# Altium PCB ZloUSB.PcbDoc
Units mm, origin at the board's own origin, x right, y up, seen from the top; angles counter-clockwise.
Board outline 40 x 20 mm, 4 copper layers (L1, L2 (GND), L3 (PWR), L4), stack 1.586 mm thick; 42 components, 35 nets, 198 pads, 66 vias.
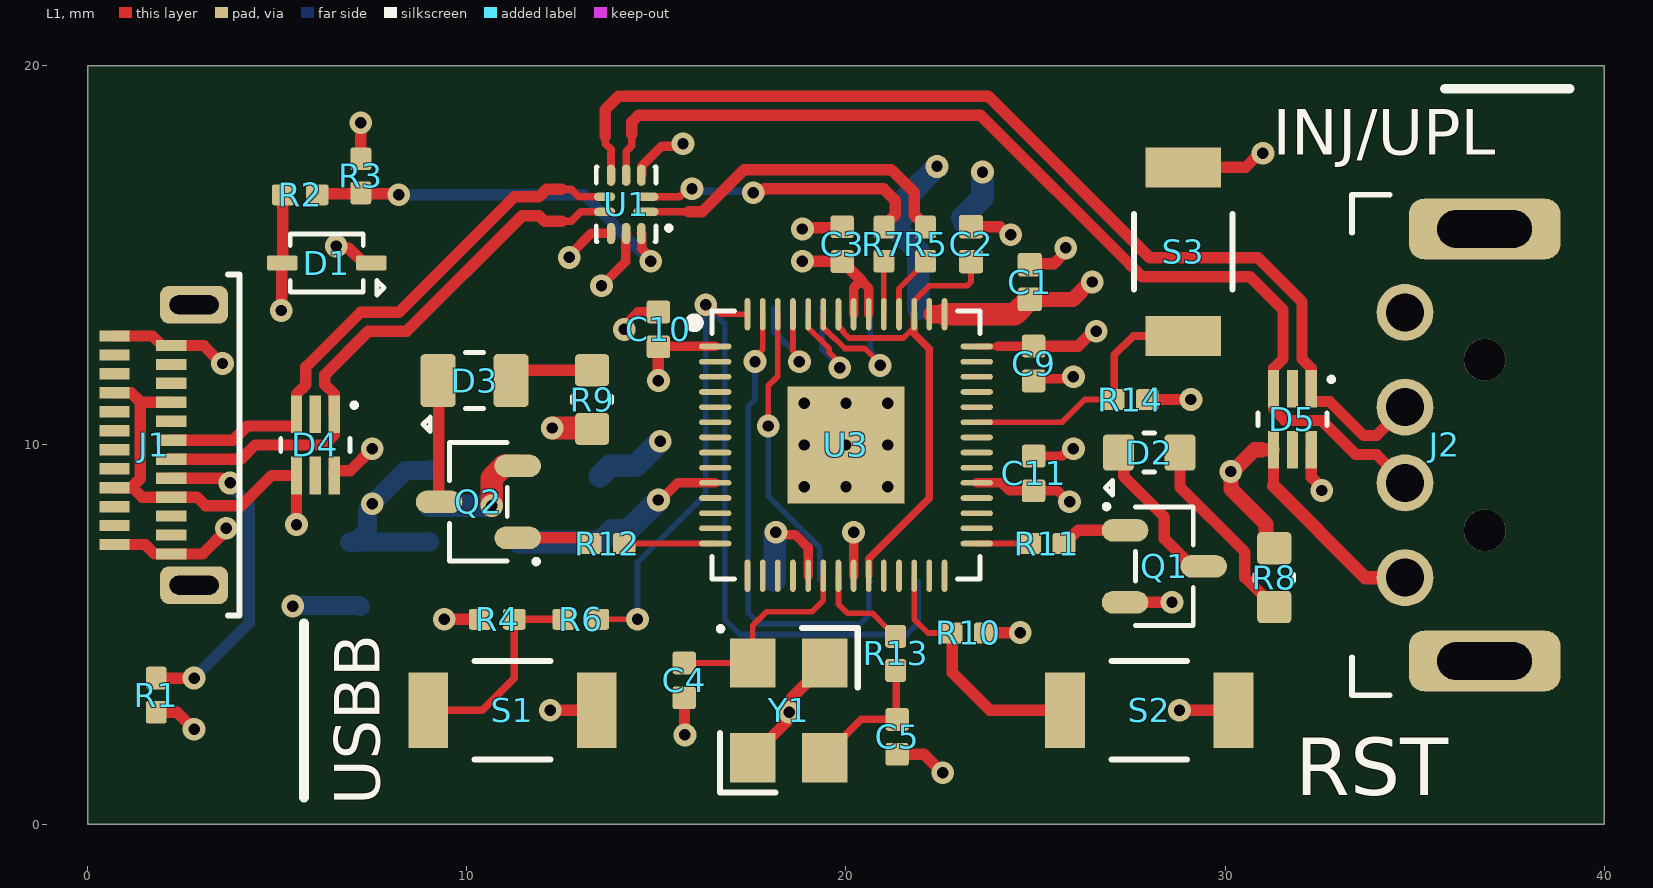
[diagram p0: L1 view]
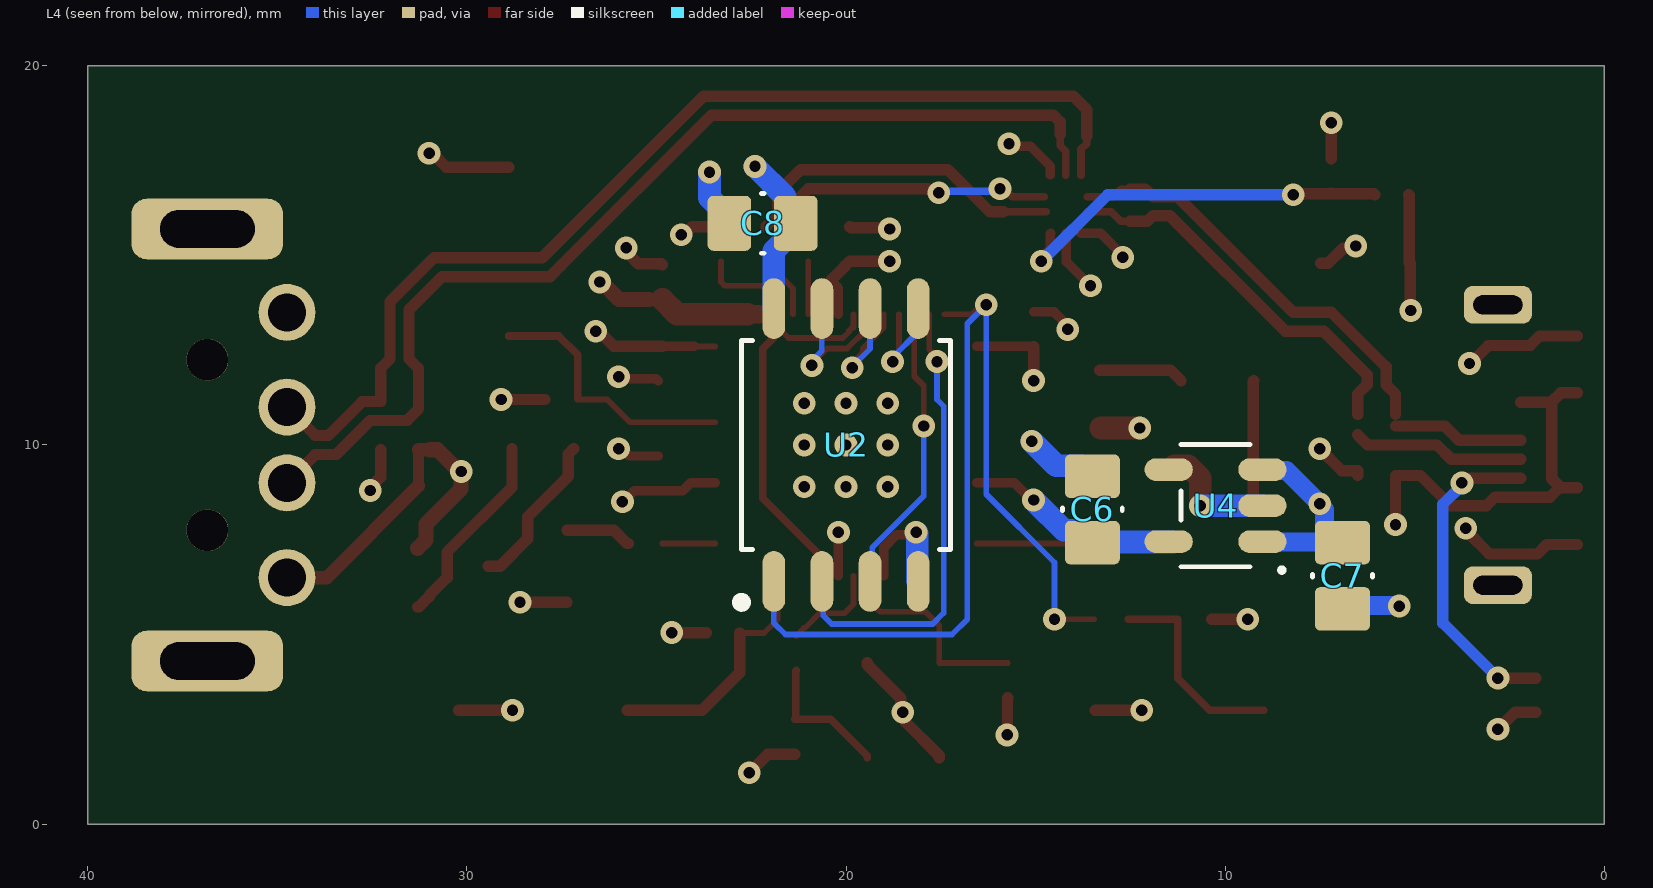
[diagram p1: L4 view, seen from below]
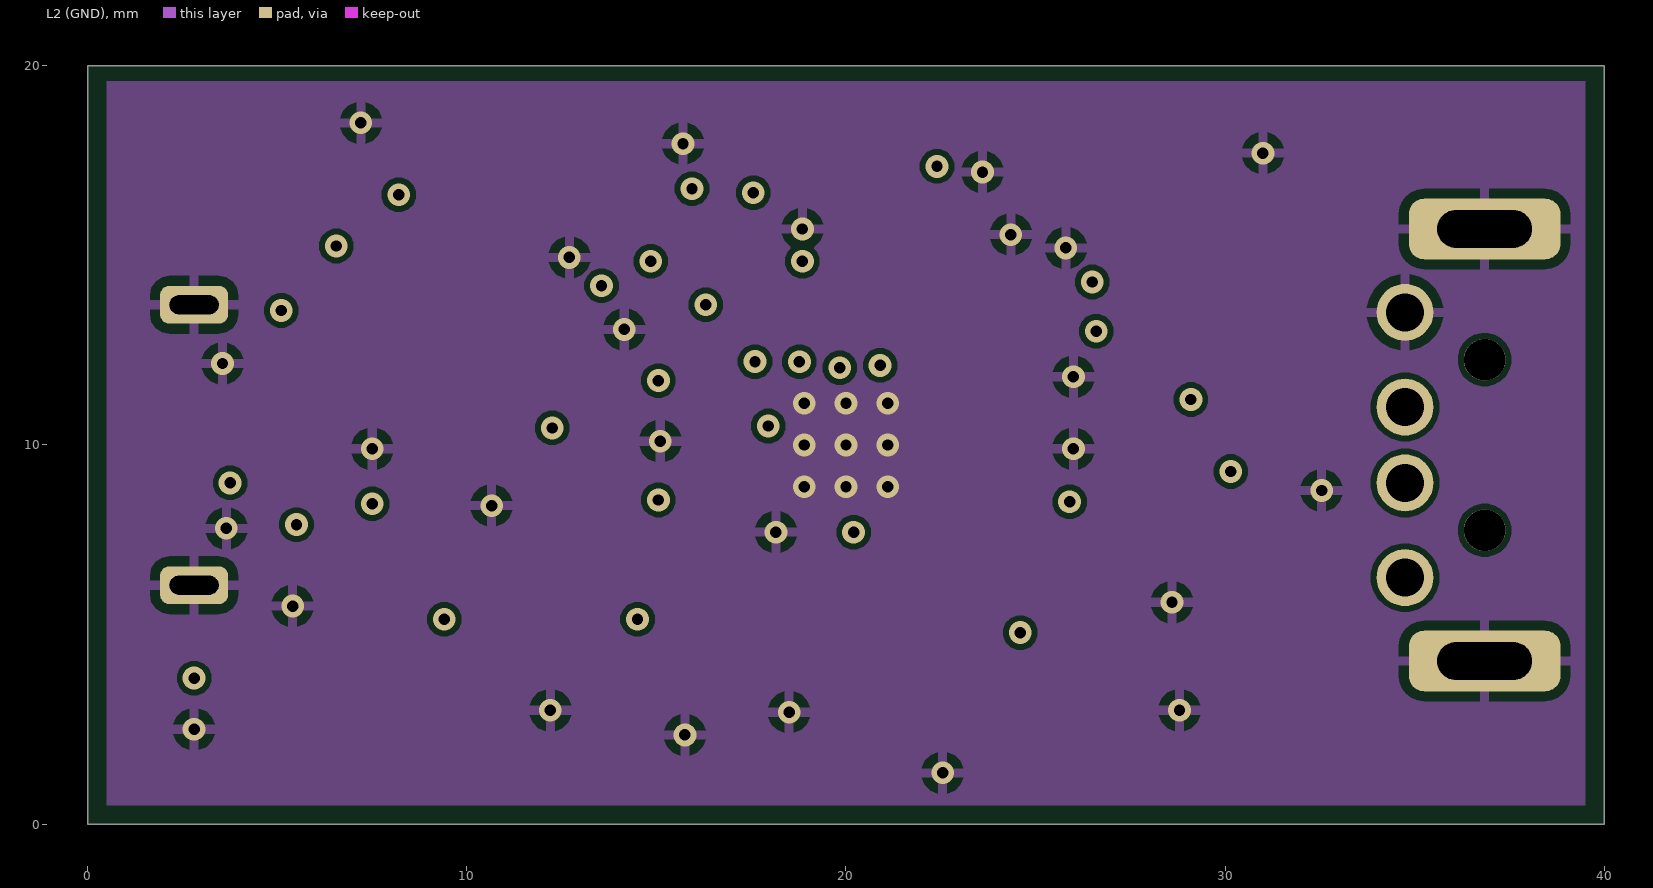
[diagram p2: L2 (GND)]
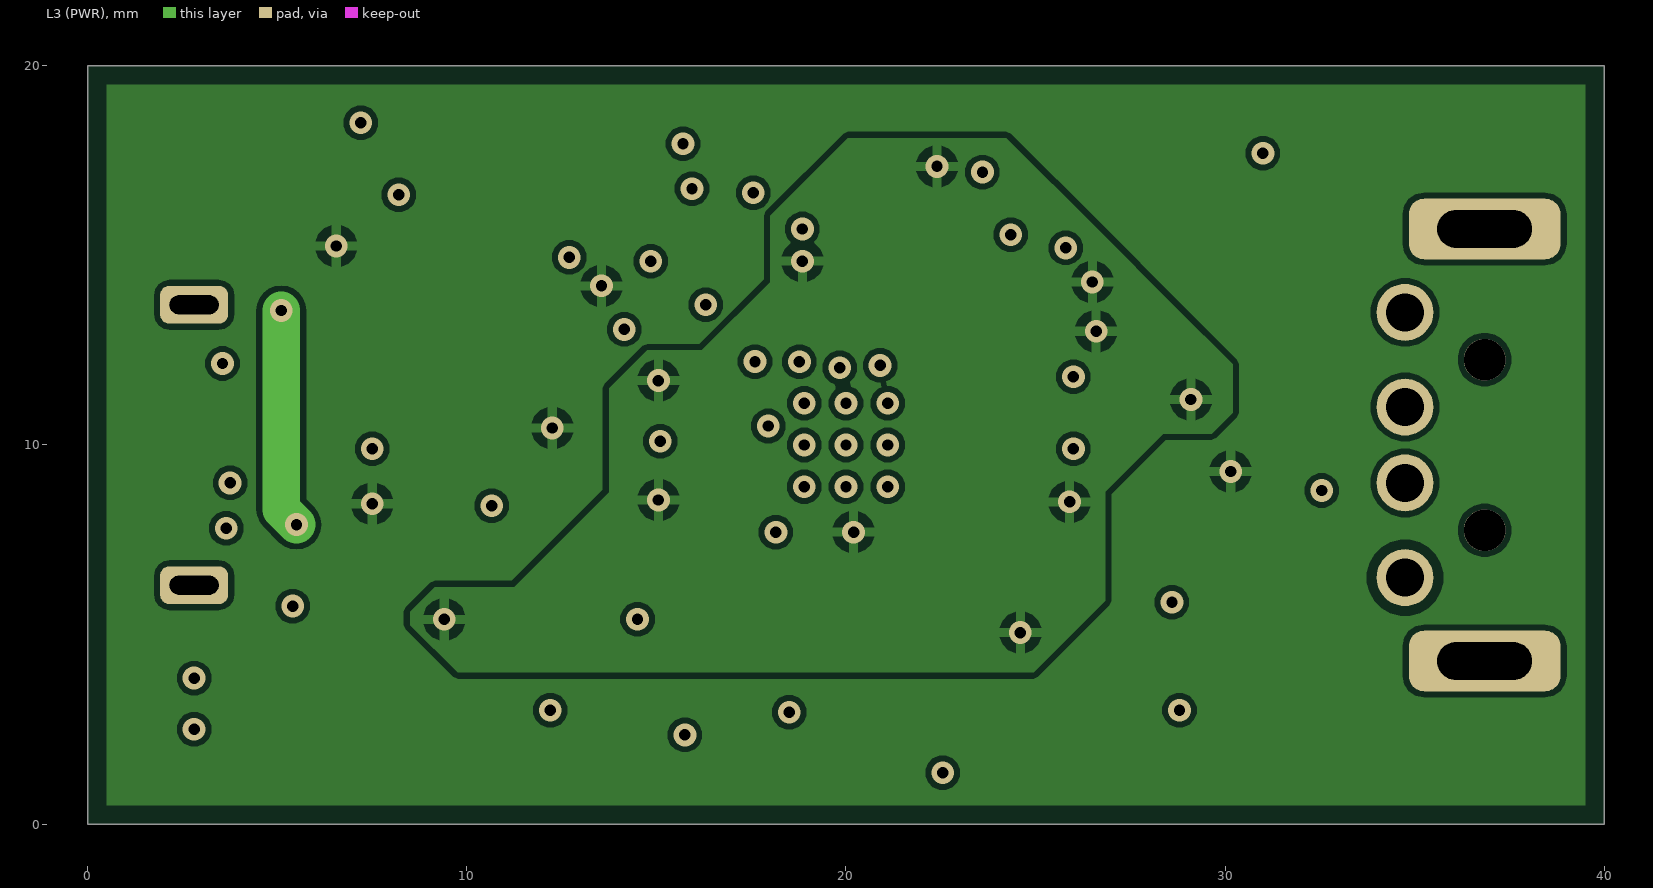
[diagram p3: L3 (PWR)]

## Layer stack, top to bottom
Top Solder: solder mask 0.0102, Solder Resist, Dk 3.5
L1: signal copper 0.035
Dielectric 1: prepreg 0.2104, PP-006, Dk 4.1
L2 (GND): signal copper 0.0152
Core: core 1.065, FR-4, Dk 4.8
L3 (PWR): signal copper 0.0152
Dielectric 4: prepreg 0.2104, PP-006, Dk 4.1
L4: signal copper 0.035
Bottom Solder: solder mask 0.0102, Solder Resist, Dk 3.5

## Board outline
0,0 40,0 40,20 0,20

## Design rules (kind name [scope] priority, off if disabled: settings)
BoardOutlineClearance [All] p1: gap=0.254 ignorepadtopadclearanceinfootprint=FALSE
Clearance [All] p1: gap=0.15 ignorepadtopadclearanceinfootprint=FALSE except(0.127: Arc-Arc Arc-Track Arc-SMDPad Track-Track Track-SMDPad; 0.25: Arc-Hole Track-Hole)
DiffPairsRouting [All] p1: maxlimit=0.4 minlimit=0.2 mostfreqgap=0.2 toplayer_minwidth=0.15 toplayer_maxwidth=0.381 toplayer_prefwidth=0.33 midlayer1_minwidth=0.15 midlayer1_maxwidth=0.381 midlayer1_prefwidth=0.33 midlayer2_minwidth=0.15 midlayer2_maxwidth=0.381 midlayer2_prefwidth=0.33 bottomlayer_minwidth=0.15 bottomlayer_maxwidth=0.381 bottomlayer_prefwidth=0.33 maxuncoupledlength=10
HoleSize [All] p1: absolutevalues=TRUE maxlimit=2.54 minlimit=0.2 maxpercent=80.000 minpercent=20.000
HoleToHoleClearance "Via Hole to Hole Clearance" [IsVia vs IsVia] p1: gap=0.254 allowstackedmicrovias=TRUE
HoleToHoleClearance "Pad Hole to Hole Clearance" [IsPad vs IsPad] p2: gap=0.475 allowstackedmicrovias=TRUE
MinimumSolderMaskSliver [All] p1: minsoldermaskwidth=0.12
PolygonConnect "+5V_VBUS Pad Disconnect" [InNet('+5V_VBUS') and IsPolygon vs Name = 'J2-1'] p1: connectstyle=NoConnect reliefconductorwidth=0.254 reliefentries=4 polygonreliefangle="90 Angle" airgapwidth=0.254
PolygonConnect [All] p2: connectstyle=Relief reliefconductorwidth=0.254 reliefentries=4 polygonreliefangle="90 Angle" airgapwidth=0.254
RoutingVias [All] p1: holewidth=0.3 width=0.6 viastyle="Through Hole" minholewidth=0.25 minwidth=0.35 maxholewidth=6.2 maxwidth=8.2
SilkToSolderMaskClearance [IsPad] p1: minsilkscreentomaskgap=0.18 clearancetoexposedcopper=TRUE
SolderMaskExpansion [All] p1: expansion=0 istentingtop=FALSE
SupplyNets "Schematic Supply Nets_3" [InNet('+5V_VBUS_C')] p1: voltage=0.000
SupplyNets "Schematic Supply Nets_2" [InNet('+5V_VBUS')] p2: voltage=0.000
SupplyNets "Schematic Supply Nets_1" [InNet('GND')] p3: voltage=0.000
SupplyNets "Schematic Supply Nets" [InNet('+3V3_REG')] p4: voltage=0.000
Width [All] p1: maxlimit=1 minlimit=0.127 preferedwidth=0.254
Width WidthPower [InNetClass('Power_Nets')] p2: maxlimit=1 minlimit=0.15 preferedwidth=0.3
25 further rules are at their usual default settings.

## Classes and differential pairs
net class USB_Nets: +3V3_REG +5V_VBUS +5V_VBUS_C GND NetJ1_A2 NetJ1_A3 NetJ1_A5 NetJ1_A8 NetJ1_A10 NetJ1_A11 NetJ1_B2 NetJ1_B3 NetJ1_B5 NetJ1_B6 NetJ1_B7 NetJ1_B8 NetJ1_B10 NetJ1_B11 NetR2_1 USB_A_D_N USB_A_D_P USB_C_D_N USB_C_D_P USB_D_N USB_D_P
net class Core_Nets: +3V3_REG +5V_VBUS GND GPIO11 GPIO18 "INJ/ U\P\L\" NetC2_1 NetC5_2 NetD2_1 NetD2_2 NetD3_1 NetD3_2 NetQ1_1 NetQ2_1 NetR5_2 NetR7_2 NetU3_2 NetU3_3 NetU3_4 NetU3_5 NetU3_6 NetU3_7 NetU3_8 NetU3_9 NetU3_11 NetU3_12 NetU3_13 NetU3_14 NetU3_15 NetU3_16 NetU3_17 NetU3_18 NetU3_24 NetU3_25 NetU3_27 NetU3_28 NetU3_30 NetU3_32 NetU3_34 NetU3_35 NetU3_36 NetU3_37 NetU3_38 NetU3_39 NetU3_40 NetU3_41 QSPI_SCLK QSPI_SD0 QSPI_SD1 QSPI_SD2 QSPI_SD3 QSPI_SS RUN U\S\B\_\B\O\O\T\ USB_D_N USB_D_P XIN XOUT
component class USB: C7 C8 D1 D4 D5 J1 J2 R1 R2 R3 U1 U4
component class Core: C1 C2 C3 C4 C5 C6 C9 C10 C11 D2 D3 Q1 Q2 R4 R5 R6 R7 R8 R9 R10 R11 R12 R13 R14 S1 S2 S3 U2 U3 Y1
differential pair USB_D: +USB_D_P -USB_D_N
differential pair USB_C_D: +USB_C_D_P -USB_C_D_N
differential pair USB_A_D: +USB_A_D_P -USB_A_D_N

## Components (designator, comment, footprint, x,y, rotation, side; value= is the part's Value field where it differs from the comment)
C1 "1uF/25V" CAPC1005X60N 24.85,14.3 r90 top
C2 "1uF/25V" CAPC1005X60N 23.3,15.3 r90 top locked
C3 "0.1uF/16V" CAPC1005X55N 19.9,15.3 r270 top locked
C4 "15pF/50V" CAPC1005X55N 15.73,3.79 r90 top locked
C5 "15pF/50V" CAPC1005X55N 21.35,2.3 r90 top
C6 "0.1uF/25V" CAPC2012X95N 13.5,8.3 r270 bottom
C7 "10uF/25V" CAPC2012X95N 6.9,6.55 r90 bottom
C8 "10uF/25V" CAPC2012X95N 22.2,15.85 r180 bottom
C9 "0.1uF/16V" CAPC1005X55N 24.95,12.15 r90 top
C10 "0.1uF/16V" CAPC1005X55N 15.05,13.05 r270 top
C11 "0.1uF/16V" CAPC1005X55N 24.95,9.25 r270 top
D1 "Guangdong Hottech 1N5819WS" SODFL250130X100N 6.3,14.8 r180 top locked
D2 "RED" DIOC1608X70N 28,9.8 r180 top
D3 "Green" DIOC2012X95N 10.2,11.7 r180 top locked
D4 "STMicroelectronics ESDAULC6-3BP6" "STMicroelectronics ESDAULC6-3BP6" 6,10 r270 top
D5 "STMicroelectronics ESDAULC6-3BP6" "STMicroelectronics ESDAULC6-3BP6" 31.78,10.68 r270 top
J1 "G-Switch GT-USB-9812A" "G-Switch GT-USB-9812A" 0.4,10 r270 top locked
J2 "YUWENFA PUBMA-R23A-016" "YUWENFA PUBMA-R23A-016" 36.85,10 r90 top
Q1 "JSCJ 2N7002" SOT95P240X115-3N 28.4,6.8 r0 top locked
Q2 "JSCJ 2N7002" SOT95P240X115-3N 10.3,8.5 r180 top locked
R1 "5k1" RESC1005X40N 1.8,3.4 r90 top
R2 "33K" RESC1005X40N 5.6,16.6 r180 top
R3 "47K" RESC1005X40N 7.2,17.1 r270 top
R4 "10K" RESC1005X40N 10.8,5.4 r180 top locked
R5 "27R4" RESC1005X40N 22.1,15.3 r270 top locked
R6 "1K" RESC1005X40N 13,5.4 r0 top locked
R7 "27R4" RESC1005X40N 21,15.3 r270 top locked
R8 "150R" RESC1608X55N 31.3,6.5 r90 top locked
R9 "100R" RESC1608X55N 13.3,11.2 r270 top locked
R10 "10K" RESC1005X40N 23.23,5.04 r0 top locked
R11 "1K" RESC1005X40N 25.3,7.4 r0 top locked
R12 "1K" RESC1005X40N 13.7,7.4 r180 top
R13 "1K" RESC1005X40N 21.31,4.5 r90 top locked
R14 "10K" RESC1005X40N 27.5,11.2 r0 top
S1 "XUNPU TS-1088-AR02016" "XUNPU TS-1088-AR02016" 11.2,3 r180 top locked
S2 "XUNPU TS-1088-AR02016" "XUNPU TS-1088-AR02016" 28,3 r180 top locked
S3 "XUNPU TS-1088-AR02016" "XUNPU TS-1088-AR02016" 28.9,15.1 r270 top
U1 "onsemi FSUSB42UMX" "onsemi FSUSB42UMX" 14.2,16.35 r180 top
U2 "W25Q128JVSIQ" SOIC127P790X216-8N 20,10 r90 bottom locked
U3 "RP2040" QFN40P700X700X90-57N 20,10 r0 top locked
U4 "AP2112K-3.3TRG1" SOT95P285X140-5N 10.25,8.4 r0 bottom
Y1 "ABM8-272-T3" "ABRACON ABM8-272-T3" 18.49,3 r270 top locked

## Footprints (in the part's own frame and the unit in brackets; to place one, negate y for a bottom-side part, rotate by r counter-clockwise, add the part's x,y. Pads: shape width x height; smd on the part's side, far side on the other; paste and mask are expansions set on the pad)
"ABRACON ABM8-272-T3" [mm]
  rect 1.3x1.2 smd mask+0.1: 1(-1.25,-0.95) 2(1.25,-0.95) 3(1.25,0.95) 4(-1.25,0.95)
  silkscreen extent -2.21,-1.86 2.17,1.82
CAPC1005X55N [mm] "Chip Capacitor, 2-Leads, Body 1.00x0.50mm, IPC Medium Density"
  rrect25% 0.6x0.62 smd mask+0.05: 1(-0.46,0) 2(0.46,0)
  body extent -0.5,-0.25 0.5,0.25, height 0.55
CAPC1005X60N [mm] "Chip Capacitor, 2-Leads, Body 1.00x0.50mm, IPC Medium Density"
  rrect25% 0.62x0.64 smd mask+0.05: 1(-0.46,0) 2(0.46,0)
  body extent -0.5,-0.25 0.5,0.25, height 0.6
CAPC2012X95N [mm] "Chip Capacitor, 2-Leads, Body 2.00x1.25mm, IPC Medium Density"
  rrect25% 1.15x1.45 smd mask+0.05: 1(-0.875,0) 2(0.875,0)
  silkscreen extent -0.04,-0.79 0.04,0.79, body extent -1,-0.63 1,0.63, height 0.95
DIOC1608X70N [mm] "Chip Diode, 2-Leads, Body 1.60x0.80mm, IPC Medium Density"
  rrect25% 0.825x0.95 smd mask+0.075: 1(-0.813,0) 2(0.813,0)
  silkscreen extent -0.14,-0.51 1.16,1.12, body extent -0.8,-0.4 0.8,0.4, height 0.7
DIOC2012X95N [mm] "Chip Diode, 2-Leads, Body 2.00x1.25mm, IPC Medium Density"
  rrect25% 0.925x1.4 smd mask+0.075: 1(-0.962,0) 2(0.962,0)
  silkscreen extent -0.24,-0.74 1.36,1.34, body extent -1,-0.63 1,0.63, height 0.95
"G-Switch GT-USB-9812A" [mm]
  rect 0.3x0.8 smd mask+0.04: A1(2.875,1.8) A2(2.375,1.8) A3(1.875,1.8) A4(1.375,1.8) A5(0.875,1.8) A6(0.375,1.8) A7(-0.125,1.8) A8(-0.625,1.8) A9(-1.125,1.8) A10(-1.625,1.8) A11(-2.125,1.8) A12(-2.625,1.8) B1(-2.875,0.3) B2(-2.375,0.3) B3(-1.875,0.3) B4(-1.375,0.3) B5(-0.875,0.3) B6(-0.375,0.3) B7(0.125,0.3) B8(0.625,0.3) B9(1.125,0.3) B10(1.625,0.3) B11(2.125,0.3) B12(2.625,0.3)
  rrect50% 1x1.8 hole 0.5 slot 1.3 at 90 deg mask+0.05: SH1(-3.7,2.4)
  rrect50% 1x1.8 hole 0.5 slot 1.3 at 90 deg mask+0.01: SH2(3.7,2.4)
  silkscreen extent -4.5,3.3 4.5,3.6
"onsemi FSUSB42UMX" [mm] "QFN, 10-Leads, Body 1.40x1.80mm, Pitch 0.40mm, IPC Medium Density"
  oval 0.663x0.225 smd mask+0.02: 1(-0.519,0.2)
  oval 0.563x0.225 smd mask+0.02: 2(-0.569,-0.2) 6(0.569,-0.2) 7(0.569,0.2)
  oval 0.225x0.563 smd mask+0.02: 3(-0.4,-0.769) 4(0,-0.769) 5(0.4,-0.769) 8(0.4,0.769) 9(0,0.769) 10(-0.4,0.769)
  silkscreen extent -1.19,-0.99 0.79,0.99, body extent -0.7,-0.9 0.7,0.9, height 0.55
QFN40P700X700X90-57N [mm] "QFN, 56-Leads, Body 7.00x7.00mm, Pitch 0.40mm, Thermal Pad 3.10x3.10mm, IPC Medium Density"
  oval 0.85x0.15 smd mask+0.05: 1(-3.45,2.6) 2(-3.45,2.2) 3(-3.45,1.8) 4(-3.45,1.4) 5(-3.45,1) 6(-3.45,0.6) 7(-3.45,0.2) 8(-3.45,-0.2) 9(-3.45,-0.6) 10(-3.45,-1) 11(-3.45,-1.4) 12(-3.45,-1.8) 13(-3.45,-2.2) 14(-3.45,-2.6) 29(3.45,-2.6) 30(3.45,-2.2) 31(3.45,-1.8) 32(3.45,-1.4) 33(3.45,-1) 34(3.45,-0.6) 35(3.45,-0.2) 36(3.45,0.2) 37(3.45,0.6) 38(3.45,1) 39(3.45,1.4) 40(3.45,1.8) 41(3.45,2.2) 42(3.45,2.6)
  oval 0.15x0.85 smd mask+0.05: 15(-2.6,-3.45) 16(-2.2,-3.45) 17(-1.8,-3.45) 18(-1.4,-3.45) 19(-1,-3.45) 20(-0.6,-3.45) 21(-0.2,-3.45) 22(0.2,-3.45) 23(0.6,-3.45) 24(1,-3.45) 25(1.4,-3.45) 26(1.8,-3.45) 27(2.2,-3.45) 28(2.6,-3.45) 43(2.6,3.45) 44(2.2,3.45) 45(1.8,3.45) 46(1.4,3.45) 47(1,3.45) 48(0.6,3.45) 49(0.2,3.45) 50(-0.2,3.45) 51(-0.6,3.45) 52(-1,3.45) 53(-1.4,3.45) 54(-1.8,3.45) 55(-2.2,3.45) 56(-2.6,3.45)
  rect 3.1x3.1 smd paste-1.55 mask+0.05: 57(0,0)
  silkscreen extent -4.13,-3.54 3.54,3.54, body extent -3.5,-3.5 3.5,3.5, height 0.9
RESC1005X40N [mm] "Chip Resistor, 2-Leads, Body 1.00x0.50mm, IPC Medium Density"
  rrect25% 0.6x0.55 smd mask+0.05: 1(-0.45,0) 2(0.45,0)
  body extent -0.5,-0.25 0.5,0.25, height 0.4
RESC1608X55N [mm] "Chip Resistor, 2-Leads, Body 1.60x0.80mm, IPC Medium Density"
  rrect25% 0.85x0.9 smd mask+0.05: 1(-0.775,0) 2(0.775,0)
  silkscreen extent -0.09,-0.51 0.09,0.51, body extent -0.8,-0.4 0.8,0.4, height 0.55
SODFL250130X100N [mm] "SODFL, 2-Leads, Body 1.70x1.30mm, IPC Medium Density"
  rrect25% 0.8x0.4 smd mask+0.075: 1(-1.175,0) 2(1.175,0)
  silkscreen extent -1.51,-0.76 0.96,0.84, body extent -0.85,-0.65 0.85,0.65, height 1
SOIC127P790X216-8N [mm] "SOIC, 8-Leads, Body 5.28x5.28mm, Pitch 1.27mm, IPC Medium Density"
  oval 1.6x0.6 smd mask+0.075: 1(-3.6,1.905) 2(-3.6,0.635) 3(-3.6,-0.635) 4(-3.6,-1.905) 5(3.6,-1.905) 6(3.6,-0.635) 7(3.6,0.635) 8(3.6,1.905)
  silkscreen extent -4.27,-2.75 2.75,2.88, body extent -2.64,-2.64 2.64,2.64, height 2.16
SOT95P240X115-3N [mm] "SOT23, 3-Leads, Body 2.90x2.40mm, Pitch 0.95mm, IPC Medium Density"
  oval 1.225x0.6 smd mask+0.075: 1(-1.038,0.95) 2(-1.038,-0.95) 3(1.037,0)
  silkscreen extent -1.59,-1.56 0.76,1.64, body extent -0.65,-1.45 0.65,1.45, height 1.15
SOT95P285X140-5N [mm] "SOT23, 5-Leads, Body 3.00x2.85mm, Pitch 0.95mm, IPC Medium Density"
  oval 1.275x0.6 smd mask+0.075: 1(-1.238,0.95) 2(-1.238,0) 3(-1.238,-0.95) 4(1.237,-0.95) 5(1.237,0.95)
  silkscreen extent -1.81,-1.61 0.91,1.76, body extent -0.8,-1.5 0.8,1.5, height 1.4
"STMicroelectronics ESDAULC6-3BP6" [mm] "SOTFL, 6-Leads, Body 1.60x1.60mm, Pitch 0.50mm, IPC Medium Density"
  rect 0.99x0.3 smd mask+0.04: 1(-0.805,0.5) 2(-0.805,0) 3(-0.805,-0.5) 4(0.805,-0.5) 5(0.805,0) 6(0.805,0.5)
  silkscreen extent -1.11,-0.91 0.17,1.09
"XUNPU TS-1088-AR02016" [mm]
  rect 1.05x2 smd mask+0.075: 1(-2.225,0) 2(2.225,0)
  silkscreen extent -1,-1.3 1,1.3
"YUWENFA PUBMA-R23A-016" [mm]
  round 1.5 hole 1 mask+0.075: 1(-3.5,2.1) 2(-1,2.1) 3(1,2.1) 4(3.5,2.1)
  rrect50% 1.6x4 hole 1 slot 2.5 at 90 deg mask+0.075: S1(-5.7,0) S2(5.7,0)
  round 1.1 hole 1.1 unplated mask+0.1: ""(-2.25,0) ""(2.25,0)
  silkscreen extent -6.6,2.5 6.6,3.5

## Part data
C1 C2: library part "Samsung Electro-Mechanics CL05A105KA5NQNC", "CAP CER 1UF 25V X5R 0402", JLCPCB Parts Type=Basic, JLCPCB PCBA Type="Economic and Standard", LCSC Part #=C52923, Manufacturer="Samsung Electro-Mechanics", Manufacturer Part Number=CL05A105KA5NQNC, ComponentLink1Description=Datasheet, ComponentLink1URL=https://mm.digikey.com/Volume0/opasdata/d220001/medias/docus/41/CL05A105KA5NQNC.pdf, Supplier 1=LCSC, Supplier Part Number 1=C52923
C3 C9 C10 C11: library part "Samsung Electro-Mechanics CL05B104KO5NNNC", "CAP CER 0.1UF 16V X7R 0402", JLCPCB Parts Type=Basic, JLCPCB PCBA Type="Economic and Standard", LCSC Part #=C1525, Manufacturer="Samsung Electro-Mechanics", Manufacturer Part Number=CL05B104KO5NNNC, ComponentLink1Description=Datasheet, ComponentLink1URL=https://mm.digikey.com/Volume0/opasdata/d220001/medias/docus/609/CL05B104KO5NNNC.pdf
C4 C5: library part "FH 0402CG150J500NT", "CAP CER 15pF 50V C0G 0402", JLCPCB Parts Type=Basic, JLCPCB PCBA Type="Economic and Standard", LCSC Part #=C1548, Manufacturer=FH, Manufacturer Part Number=0402CG150J500NT, ComponentLink1Description=Datasheet, ComponentLink1URL=https://www.lcsc.com/datasheet/C1548.pdf?spm=wm.sxq.inf.ggs&lcsc_vid=FlIPVFxSEVAMBl1QQ1JdVl0EQlZYVFFSQVZZUFJeRVcxVlNeQ1ZcX1ZUQlReXjsOAxUeFF5JWBYZEEoKFBINSQcJGk4%3D
C6: library part "Yageo CC0805KRX7R8BB104", "CAP CER 0.1UF 25V X7R 0805", JLCPCB Parts Type=Extended, JLCPCB PCBA Type="Economic and Standard", LCSC Part #=C519981, Manufacturer=Yageo, Manufacturer Part Number=CC0805KRX7R8BB104, ComponentLink1Description=Datasheet, ComponentLink1URL=https://yageogroup.com/content/datasheet/asset/file/UPY-GPHC_X7R_6_3V-TO-250V, Supplier 1=LCSC, Supplier Part Number 1=C519981
C7 C8: library part "Samsung Electro-Mechanics CL21B106KAYQNNE", "CAP CER 10uF 25V X7R 0805", JLCPCB Parts Type=Extended, JLCPCB PCBA Type="Economic and Standard", LCSC Part #=C3039694, Manufacturer="Samsung Electro-Mechanics", Manufacturer Part Number=CL21B106KAYQNNE, ComponentLink1Description=Datasheet, ComponentLink1URL=https://mm.digikey.com/Volume0/opasdata/d220001/medias/docus/7851/1276_CL21B1.pdf, Supplier 1=LCSC, Supplier Part Number 1=C3039694
D1: "DIODE SCHOTTKY 40V SOD-323", JLCPCB Parts Type=Basic, JLCPCB PCBA Type="Economic and Standard", LCSC Part #=C191023, Manufacturer="Guangdong Hottech", Manufacturer Part Number=1N5819WS, ComponentLink1Description=Datasheet, ComponentLink1URL=https://www.lcsc.com/datasheet/C191023.pdf?spm=wm.sxq.inf.ggs&lcsc_vid=FgUKAwAHT1hdAgBSEQJZUFZfRwdWX1BXQgcMVwVSEgcxVlNeQ1dbV11VRlhXXzsOAxUeFF5JWBYZEEoKFBINSQcJGk4%3D, ComponentLink2Description="3D Model Source", Supplier 1=LCSC, Supplier Part Number 1=C191023
D2: library part "Hubei KENTO Elec KT-0603R", "LED RED WATER CLEAR 0603 SMD", JLCPCB Parts Type=Basic, JLCPCB PCBA Type="Economic and Standard", LCSC Part #=C2286, Manufacturer="Hubei KENTO Elec", Manufacturer Part Number=KT-0603R, ComponentLink1Description=Datasheet, ComponentLink1URL=https://www.lcsc.com/datasheet/C2286.pdf?spm=wm.sxq.inf.ggs&lcsc_vid=EgULX1wEEgNWVVAHFFheXgEEQVBbUFYFRwIPBF1XRgMxVlNeQ1RbXlJRQFJaUzsOAxUeFF5JWBYZEEoKFBINSQcJGk4%3D, ComponentLink2Description="3D Model Source"
D3: library part "Hubei KENTO Elec KT-0805G", "LED EMERALD GREEN 0805 SMD", JLCPCB Parts Type=Basic, JLCPCB PCBA Type="Economic and Standard", LCSC Part #=C2297, Manufacturer="Hubei KENTO Elec", Manufacturer Part Number=KT-0805Y, ComponentLink1Description=Datasheet, ComponentLink1URL=https://www.lcsc.com/datasheet/C2297.pdf?spm=wm.sxq.inf.ggs&lcsc_vid=EgULX1wEEgNWVVAHFFheXgEEQVBbUFYFRwIPBF1XRgMxVlNeQ1RYVlRQT1VeUDsOAxUeFF5JWBYZEEoKFBINSQcJGk4%3D, ComponentLink2Description="3D Model Source"
D4 D5: "TVS DIODE 5VWM SOT666", JLCPCB Parts Type=Extended, JLCPCB PCBA Type="Economic and Standard", LCSC Part #=C1976755, Manufacturer=STMicroelectronics, Manufacturer Part Number=ESDAULC6-3BP6, ComponentLink1Description=Datasheet, ComponentLink1URL=https://www.st.com/resource/en/datasheet/cd00165276.pdf, ComponentLink2Description="3D Model Source"
J1: "USB 3.1 SMD USB, DVI, HDMI Connector Adapters RoHS", JLCPCB Parts Type=Extended, JLCPCB PCBA Type="Economic and Standard", LCSC Part #=C53055684, Manufacturer=G-Switch, Manufacturer Part Number=GT-USB-9812A, ComponentLink1Description=Datasheet, ComponentLink1URL=https://www.lcsc.com/datasheet/C53055684.pdf?spm=wm.sxq.inf.ggs&lcsc_vid=QFhdBFUAE1JXUFRfFQQLUV0CQlRcUV0CRAJZXwEFRlYxVlNeQ1leUVJRT1lcVTsOAxUeFF5JWBYZEEoKFBINSQcJGk4%3D, ComponentLink2Description="3D Model Source"
J2: "-25℃~+85℃ 0.95mm 1 1,500 Cycles 1.5A 18.8mm 30V 4P Male Recessed Type-A USB 2.0 White With Locating Pins Plugin USB Connectors ROHS", JLCPCB Parts Type=Extended, JLCPCB PCBA Type="Economic and Standard", LCSC Part #=C55061488, Manufacturer=YUWENFA, Manufacturer Part Number=PUBMA-R23A-016, ComponentLink1Description=Datasheet, ComponentLink1URL=https://www.lcsc.com/datasheet/C55061488.pdf, ComponentLink2Description="3D Model Source"
Q1 Q2: "MOSFET N-CH 60V 115mA SOT-23", JLCPCB Parts Type=Basic, JLCPCB PCBA Type="Economic and Standard", LCSC Part #=C8545, Manufacturer=JSCJ, Manufacturer Part Number=2N7002, ComponentLink1Description=Datasheet, ComponentLink1URL=https://www.lcsc.com/datasheet/C8545.pdf?spm=wm.sxq.inf.ggs&lcsc_vid=EgULX1wEEgNWVVAHFFheXgEEQVBbUFYFRwIPBF1XRgMxVlNeQ1RYUlNfQFBWVTsOAxUeFF5JWBYZEEoKFBINSQcJGk4%3D, ComponentLink3Description="3D Model Source"
R1: library part "UNI-ROYAL 0402WGF5101TCE", "RES 5.1kΩ ±1% 62.5mW 0402", JLCPCB Parts Type=Basic, JLCPCB PCBA Type="Economic and Standard", LCSC Part #=C25905, Manufacturer=UNI-ROYAL, Manufacturer Part Number=0402WGF5101TCE, ComponentLink1Description=Datasheet, ComponentLink1URL=https://www.lcsc.com/datasheet/C25905.pdf?spm=wm.sxq.inf.ggs&lcsc_vid=QwRWVlFeFgUPVwAHRlQMVFRWElEIXlYDQFlcUQdRRFYxVlNeRVdaVFZVRFRdXzsOAxUeFF5JWBYZEEoKFBINSQcJGk4%3D, ComponentLink2Description="3D Model Source"
R2: library part "UNI-ROYAL 0402WGF3302TCE", "RES 33kΩ ±1% 62.5mW 0402", JLCPCB Parts Type=Basic, JLCPCB PCBA Type="Economic and Standard", LCSC Part #=C25779, Manufacturer=UNI-ROYAL, Manufacturer Part Number=0402WGF3302TCE, ComponentLink1Description=Datasheet, ComponentLink1URL=https://www.lcsc.com/datasheet/C25779.pdf?spm=wm.sxq.inf.ggs&lcsc_vid=FgUKAwAHT1hdAgBSEQJZUFZfRwdWX1BXQgcMVwVSEgcxVlNeQ1dbVVBSRVJXVzsOAxUeFF5JWBYZEEoKFBINSQcJGk4%3D, ComponentLink2Description="3D Model Source"
R3: library part "UNI-ROYAL 0402WGF4702TCE", "RES 47kΩ ±1% 62.5mW 0402", JLCPCB Parts Type=Basic, JLCPCB PCBA Type="Economic and Standard", LCSC Part #=C25792, Manufacturer=UNI-ROYAL, Manufacturer Part Number=0402WGF4702TCE, ComponentLink1Description=Datasheet, ComponentLink1URL=https://www.lcsc.com/datasheet/C25792.pdf?spm=wm.sxq.inf.ggs&lcsc_vid=FgUKAwAHT1hdAgBSEQJZUFZfRwdWX1BXQgcMVwVSEgcxVlNeQ1dbVVFURVhdVTsOAxUeFF5JWBYZEEoKFBINSQcJGk4eFQsCAgIaSgADAwAHC0slRVRZUF1IHxUDCw%3D%3D, ComponentLink2Description="3D Model Source"
R4 R10 R14: library part "UNI-ROYAL 0402WGF1002TCE", "RES 10kΩ ±1% 62.5mW 0402", JLCPCB Parts Type=Basic, JLCPCB PCBA Type="Economic and Standard", LCSC Part #=C25744, Manufacturer=UNI-ROYAL, Manufacturer Part Number=0402WGF1002TCE, ComponentLink1Description=Datasheet, ComponentLink1URL=https://www.lcsc.com/datasheet/C25905.pdf?spm=wm.sxq.inf.ggs&lcsc_vid=QwRWVlFeFgUPVwAHRlQMVFRWElEIXlYDQFlcUQdRRFYxVlNeRVdaVFZVRFRdXzsOAxUeFF5JWBYZEEoKFBINSQcJGk4%3D, ComponentLink2Description="3D Model Source"
R5 R7: library part "UNI-ROYAL 0402WGF274JTCE", "RES 27.4Ω ±1% 62.5mW 0402", JLCPCB Parts Type=Extended, JLCPCB PCBA Type="Economic and Standard", LCSC Part #=C31439, Manufacturer=UNI-ROYAL, Manufacturer Part Number=0402WGF274JTCE, ComponentLink1Description=Datasheet, ComponentLink1URL=https://www.lcsc.com/datasheet/C31439.pdf?spm=wm.sxq.inf.ggs&lcsc_vid=RVMLXldXRwcKUgUEEVhaBQcAQ1deVlcCFVAKV1VTRVcxVlNeRVdaX1xXQ1laUDsOAxUeFF5JWBYZEEoKFBINSQcJGk4%3D, ComponentLink2Description="3D Model Source", Supplier 1=LCSC, Supplier Part Number 1=C31439
R6 R11 R12 R13: library part "UNI-ROYAL 0402WGF1001TCE", "RES 1kΩ ±1% 62.5mW 0402", JLCPCB Parts Type=Basic, JLCPCB PCBA Type="Economic and Standard", LCSC Part #=C11702, Manufacturer=UNI-ROYAL, Manufacturer Part Number=0402WGF1001TCE, ComponentLink1Description=Datasheet, ComponentLink1URL=https://www.lcsc.com/datasheet/C25905.pdf?spm=wm.sxq.inf.ggs&lcsc_vid=QwRWVlFeFgUPVwAHRlQMVFRWElEIXlYDQFlcUQdRRFYxVlNeRVdaVFZVRFRdXzsOAxUeFF5JWBYZEEoKFBINSQcJGk4%3D, ComponentLink2Description="3D Model Source"
R8: library part "UNI-ROYAL 0603WAF1500T5E", "RES 150Ω ±1% 100mW 0603", JLCPCB Parts Type=Basic, JLCPCB PCBA Type="Economic and Standard", LCSC Part #=C22808, Manufacturer=UNI-ROYAL, Manufacturer Part Number=0603WAF1500T5E, ComponentLink1Description=Datasheet, ComponentLink1URL=https://www.lcsc.com/datasheet/C22808.pdf?spm=wm.sxq.inf.ggs&lcsc_vid=EgULX1wEEgNWVVAHFFheXgEEQVBbUFYFRwIPBF1XRgMxVlNeQ1RYUVJQQFdbXzsOAxUeFF5JWBYZEEoKFBINSQcJGk4%3D, ComponentLink2Description="3D Model Source"
R9: library part "UNI-ROYAL 0603WAF1000T5E", "RES 100Ω ±1% 100mW 0603", JLCPCB Parts Type=Basic, JLCPCB PCBA Type="Economic and Standard", LCSC Part #=C22775, Manufacturer=0603WAF1000T5E, ComponentLink1Description=Datasheet, ComponentLink1URL=https://www.lcsc.com/datasheet/C22775.pdf?spm=wm.sxq.inf.ggs&lcsc_vid=EgULX1wEEgNWVVAHFFheXgEEQVBbUFYFRwIPBF1XRgMxVlNeQ1RYUFVUR1VcXjsOAxUeFF5JWBYZEEoKFBINSQcJGk4eFQsCAgIaSgADAwAHC0slRVNWV1xIHxUDCw%3D%3D, ComponentLink2Description="3D Model Source", Manufacturer Part Number=0603WAF1000T5E
S1 S2 S3: "SWITCH TACTILE SPST 160gf SMD", JLCPCB Parts Type=Basic, JLCPCB PCBA Type="Economic and Standard", LCSC Part #=C720477, Manufacturer=XUNPU, Manufacturer Part Number=TS-1088-AR02016, ComponentLink1Description=Datasheet, ComponentLink1URL=https://www.lcsc.com/datasheet/C720477.pdf?spm=wm.sxq.inf.ggs&lcsc_vid=QlFWU1RUTlJcVlxXFVVfUV1WQlNXBFRVFQQIX1EFTwMxVlNeRVldVFxXRVlXUTsOAxUeFF5JWBYZEEoKFBINSQcJGk4%3D, ComponentLink2Description="3D Model Source", Supplier 1=LCSC, Supplier Part Number 1=C720477
U1: "IC USB SWITCH DPDT 10UMLP", JLCPCB Parts Type=Extended, JLCPCB PCBA Type="Economic and Standard", LCSC Part #=C11145, Manufacturer=onsemi, Manufacturer Part Number=FSUSB42UMX, ComponentLink1Description=Datasheet, ComponentLink1URL=https://www.onsemi.com/pdf/datasheet/fsusb42-d.pdf, ComponentLink2Description="3D Model Source", Supplier 1=LCSC, Supplier Part Number 1=C11145
U2: library part "Winbond W25Q128JVSIQ", "FLASH - NOR Memory IC 128Mbit SPI - Quad I/O, QPI 133 MHz 8-SOIC", JLCPCB Parts Type=Basic, JLCPCB PCBA Type="Economic and Standard", LCSC Part #=C97521, Manufacturer="Winbond Electronics", ComponentLink1Description=Datasheet, ComponentLink1URL=https://mm.digikey.com/Volume0/opasdata/d220001/medias/docus/7161/256_W25Q128JV.pdf, ComponentLink2Description="3D Model Source", Manufacturer Part Number=W25Q128JVSIQ, Supplier 1=LCSC, Supplier Part Number 1=C97521
U3: library part "Raspberry Pi RP2040", "ARM® Cortex®-M0+ - Microcontroller IC 32-Bit Dual-Core 133MHz External Program Memory 56-QFN (7x7)", JLCPCB Parts Type=Extended, JLCPCB PCBA Type="Economic and Standard", LCSC Part #=C2040, Manufacturer="Raspberry Pi", Manufacturer Part Number=SC0914(13), ComponentLink1Description=Datasheet, ComponentLink1URL=https://pip-assets.raspberrypi.com/categories/814-rp2040/documents/RP-008371-DS-1-rp2040-datasheet.pdf, ComponentLink2Description="3D Model Source", Supplier 1=LCSC, Supplier Part Number 1=C2040
U4: library part "Diodes Inc. AP2112K-3.3TRG1", "IC REG LINEAR 3.3V 600MA SOT-25", JLCPCB Parts Type=Extended, JLCPCB PCBA Type="Economic and Standard", LCSC Part #=C51118, Manufacturer="Diodes Incorporated", ComponentLink1Description=Datasheet, ComponentLink1URL=https://www.diodes.com/assets/Datasheets/AP2112.pdf, Manufacturer Part Number=AP2112K-3.3TRG1, Supplier 1=LCSC, Supplier Part Number 1=C51118
Y1: library part "ABRACON ABM8-272-T3", "12 MHz ±30ppm Crystal 10pF 50 Ohms 4-SMD, No Lead", JLCPCB Parts Type=Extended, JLCPCB PCBA Type="Economic and Standard", LCSC Part #=C20625731, Manufacturer=ABRACON, ComponentLink1Description=Datasheet, ComponentLink1URL=https://abracon.com/datasheets/ABM8-272-T3.pdf, ComponentLink2Description="3D Model Source", Manufacturer Part Number=ABM8-272-T3, Supplier 1=LCSC, Supplier Part Number 1=C20625731

## Via types
v1: diameter 0.6, hole 0.3, L1 to L4, tented both sides, 52 vias
v2: diameter 0.6, hole 0.3, L1 to L4, tented bottom, 9 vias
v3: diameter 0.6, hole 0.3, L1 to L4, 5 vias

## Nets (pads, with @x,y where several pads share a name; then routed paths per layer and width w, separated by ;. In a path a pad name is that pad's centre, name@x,y a point inside that pad or via, vN(x,y) a via of type N, cw(c..) or ccw(c..) an arc to the next point about the centre after c; other vN are vias at no path point)
+3V3_REG: C1.1 C3.2 C6.2 C8.2 C9.2 C10.2 C11.2 R4.2 R10.2 R14.2 U2.8 U3.1 U3.10 U3.22 U3.33 U3.42 U3.43 U3.44 U3.48 U3.49 U4.5 | length 30.5
  L1 w0.15: U3.42 23.99,12.6 24,12.61
  L1 w0.25: v1(15.05,8.55) 15.105,8.55 15.555,9 U3.10 ; C10.2@15.06,12.6 U3.1 ; U3.22 v1(20.2,7.7) ; U3.49 20.2,14.14 20.4,14.34 20.6,14.14 U3.48 ; U3.33 24.1,9 24.31,8.79 C11.2 25.592,8.79 25.882,8.5 v1(25.9,8.5) ; 24,12.61 C9.2@24.85,12.61
  L1 w0.3: v1(9.4,5.4) R4.2 ; v1(15.05,11.7) C10.2 ; v1(18.85,14.85) 18.855,14.845 19.895,14.845 C3.2 19.91,14.84 20.06,14.69 20.06,14.68 20.4,14.34 ; R10.2 23.685,5.045 24.595,5.045 v1(24.6,5.05) ; C9.2@24.85,12.61 C9.2 26.129,12.61 26.519,13 v1(26.6,13) ; R14.2 v1(29.1,11.2)
  L1 w0.4: 25.2,13.84 25.986,13.84 26.446,14.3 v1(26.5,14.3)
  L1 w0.5: 22.3,13.45 U3.43 ; C1.1@24.84,13.84 C1.1
  L1 w0.6: U3.43 24.45,13.45 C1.1@24.84,13.84
  L4 w0.5: U4.5@11.362,7.45 U4.5@11.375,7.438
  L4 w0.6: U4.5@11.375,7.438 C6.2@13.487,7.438 ; C6.2 13.825,7.75 14.25,7.75 v1@15.031,8.531 ; C8.2@21.325,15.7 21.905,15.12 U2.8 ; C8.2 21.6,16.125 21.6,16.55 v1(22.4,17.35)
+5V_VBUS: C7.2 D1.1 D5.4 J2.1 R8.2 R9.2 U1.9 U4.1 U4.3 | length 18.3
  L1 w0.25: v1(13.55,14.2) 14.188,14.837 14.188,15.569 U1.9
  L1 w0.3: v1(6.55,15.25) 6.607,15.193 6.882,15.193 7.275,14.8 D1.1 ; R9.2@13.287,10.438 R9.2 ; 31.28,8.921 D5.4@31.28,9.713
  L1 w0.35: 30.975,9.875 D5.4 ; 31.28,8.921 33.701,6.5 J2.1
  L1 w0.4: 30.975,9.875 30.779,9.875 30.204,9.3 v1(30.15,9.3) 30.161,9.289 30.161,8.839 31.082,7.918 31.082,7.493 R8.2
  L1 w0.6: v1(12.25,10.45) R9.2@13.275,10.45
  L4 w0.5: C7.2 7.05,7.425 C7.2@7.069,7.444 ; C7.2@6.919,7.444 C7.2@7.069,7.444 ; U4.1 9.006,7.444 C7.2@7.069,7.444 ; U4.3 8.993,9.331 8.381,9.331 v1(7.5,8.45) 7.5,8.423 7.375,8.298 7.375,7.75 C7.2@7.069,7.444
+5V_VBUS_C: D1.2 D4.4 J1.A4 J1.A9 J1.B4 J1.B9 R2.2 | length 19.4
  L1 w0.3: J1.B9 1.142,8.875 1.377,9.11 1.377,11.14 1.142,11.375 J1.B4 ; 1.175,8.875 1.425,8.625 J1.A4 2.876,8.625 3.101,8.4 4.05,8.4 4.845,9.195 D4.4 5.5,8.65 v1(5.5,7.9) ; 1.392,11.125 J1.A9 ; v1(5.1,13.55) 5.112,13.563 D1.2@5.112,14.8 ; D1.2 5.137,14.813 5.137,16.588 R2.2
  L3 (PWR) w1: v1(5.1,13.55) 5.1,8.3 v1(5.5,7.9)
GND: C1.2 C2.2 C3.1 C4.1 C5.1 C6.1 C7.1 C8.1 C9.1 C10.1 C11.1 D4.6 D5.6 J1.A1 J1.A12 J1.B1 J1.B12 J1.SH1 J1.SH2 J2.4 J2.S1 J2.S2 Q1.2 Q2.2 R1.1 R3.1 S1.1 S2.1 S3.1 U1.3 U1.8 U2.4 U3.19 U3.57 U4.2 Y1.2 Y1.4 | length 44.4
  L1 w0.2: U1.3 U1.3@14.605,17.124
  L1 w0.25: v1(12.7,14.95) 12.7,15.005 13.276,15.581 U1.8 ; v1(14.15,13.05) 14.217,13.117 14.217,13.217 14.51,13.51 C10.1 ; U1.3@14.605,17.124 14.605,17.355 15.133,17.883 15.633,17.883 v1(15.7,17.95) ; v1(18.15,7.7) 18.217,7.633 18.667,7.633 19,7.3 U3.19 ; C11.1 25.715,9.71 25.905,9.9 v1(26,9.9) ; C9.1 25.005,11.745 25.945,11.745 v1(26,11.8)
  L1 w0.3: J1.B12 1.508,7.375 1.758,7.125 J1.A1 3.025,7.125 3.65,7.75 v1(3.65,7.8) ; J1.B1 1.7,12.875 1.95,12.625 J1.A12 3.05,12.625 3.525,12.15 v1(3.55,12.15) ; R1.1 2.35,2.95 v1(2.8,2.5) ; D4.6 6.5,9.324 6.924,9.324 v1(7.5,9.9) ; R3.1 v1(7.2,18.5) ; v1(12.2,3) S1.1 ; C4.1 15.74,3.32 15.74,2.36 v1(15.75,2.35) ; Y1.2 17.54,1.8 18.443,2.703 18.443,2.893 v1(18.5,2.95) 18.557,3.007 18.557,3.317 19.44,4.2 Y1.4 ; v1(18.85,15.7) 18.88,15.73 19.87,15.73 C3.1 ; C5.1 22.06,1.84 v1(22.55,1.35) ; C2.2 23.305,15.755 24.064,15.755 24.269,15.55 v1(24.35,15.55) ; C1.2 24.87,14.78 25.486,14.78 25.743,15.037 25.743,15.143 v1(25.8,15.2) ; Q1.2 v1(28.6,5.85) ; v1(28.8,3) S2.1 ; S3.1 30.544,17.325 30.919,17.7 v1(31,17.7) ; D5.6 32.28,9.151 32.55,8.881 v1(32.55,8.8)
  L1 w0.6: v1(10.65,8.4) 10.65,9.124 10.976,9.45 Q2.2
  L4 w0.25: U2.4 U2.4@18.098,6.402
  L4 w0.3: U2.4@18.098,6.402 U2.4@18.123,6.428 ; v1@18.123,7.673 v1(18.15,7.7)
  L4 w0.5: v1(5.4,5.75) 5.412,5.763 7.163,5.763 C7.1@7.187,5.738 ; C8.1 C8.1@23.075,16
  L4 w0.6: U4.2 v1(10.65,8.4) ; C6.1 13.775,9.45 14.45,9.45 v1(15.1,10.1) ; U2.4@18.123,6.428 v1@18.123,7.673 ; C8.1@23.075,16 23.6,16.525 v1@23.6,17.173
  other v1: 23.6,17.2
  other v2: 18.9,8.9 20,8.9 21.1,8.9 18.9,10 20,10 21.1,10 18.9,11.1 20,11.1 21.1,11.1
GPIO11: R12.1 U3.14 | length 2.4
  L1 w0.15: R12.1 U3.14
GPIO18: R11.1 U3.29 | length 1.4
  L1 w0.15: U3.29 R11.1
"INJ/ U\P\L\": R14.1 S3.2 U3.37 | length 7.1
  L1 w0.15: U3.37 25.7,10.6 26.3,11.2 R14.1 R14.1@27.075,11.225
  L1 w0.2: R14.1@27.075,11.225 27.075,12.375 27.575,12.875 S3.2
NetC2_1: C2.1 U3.23 U3.45 U3.50 | length 12.9
  L1 w0.15: U3.50 19.8,13.1 19.835,13.1 19.923,13.012 19.923,12.985 20.085,12.823 21.515,12.823 21.792,13.1 U3.45@21.8,13.1 ; U3.45 21.8,13.8 22.2,14.2 23.2,14.2 23.3,14.3 C2.1
  L1 w0.2: U3.23 20.6,7 22.2,8.6 22.2,12.539 21.8,12.939 21.8,13.2 U3.45
NetC5_2: C5.2 R13.1 Y1.3 | length 3.7
  L1 w0.2: Y1.3 19.44,1.8 20.4,2.76 C5.2 21.33,2.78 21.33,4.03 R13.1
NetD2_1: D2.1 R8.1 | length 5.2
  L1 w0.3: D2.1@28.813,9.9 28.813,8.888 30.525,7.175 30.525,6.5 31,6.025 31,6 31.275,5.725 R8.1
NetD2_2: D2.2 Q1.3 | length 4.2
  L1 w0.3: D2.2@27.187,9.9 27.325,9.762 27.325,9.175 28.4,8.1 28.4,7.525 29.125,6.8 Q1.3
NetD3_1: D3.1 R9.1 | length 2.3
  L1 w0.3: D3.1 11.438,11.975 R9.1
NetD3_2: D3.2 Q2.3 | length 3.2
  L1 w0.3: D3.2 9.25,11.687 Q2.3@9.25,8.513
NetJ1_A5: J1.A5 R1.2 | length 8.6
  L1 w0.3: R1.2 v1(2.8,3.85) ; J1.A5 3.544,9.125 3.669,9 v1(3.75,9)
  L4 w0.3: v1(2.8,3.85) 4.25,5.3 4.25,8.439 3.75,8.939 v1(3.75,9)
NetQ1_1: Q1.1 R11.2 | length 1.8
  L1 w0.3: R11.2 25.775,7.4 26.125,7.75 Q1.1
NetQ2_1: Q2.1 R12.2 | length 2
  L1 w0.3: Q2.1 13.075,7.55 13.225,7.4 R12.2
NetR2_1: R2.1 R3.2 U1.10 | length 10.4
  L1 w0.25: U1.10 14.612,15.569 14.612,15.182 14.85,14.945 v1(14.85,14.85)
  L1 w0.3: R2.1 6.075,16.625 7.175,16.625 R3.2 7.225,16.625 8.175,16.625 v1(8.2,16.6)
  L4 w0.3: v1(8.2,16.6) 13.1,16.6 v1(14.85,14.85)
NetR5_2: R5.2 U3.46 | length 1.7
  L1 w0.15: U3.46 21.4,14.125 22.1,14.825 R5.2
NetR7_2: R7.2 U3.47 | length 1.4
  L1 w0.15: U3.47 R7.2
QSPI_SCLK: U2.6 U3.52 | length 3.6
  L1 w0.15: U3.52 19,13.1 19.561,12.539 19.561,12.433 19.834,12.161 v3(19.834,12.039)
  L4 w0.15: U2.6 19.442,13.523 19.365,13.446 19.365,12.536 19.834,12.068 v3(19.834,12.039)
QSPI_SD0: U2.5 U3.53 | length 3
  L1 w0.15: U3.53 18.6,12.491 18.771,12.32 v3(18.771,12.198)
  L4 w0.15: U2.5 18.095,12.987 18.771,12.311 v3(18.771,12.198)
QSPI_SD1: U2.2 U3.55 | length 12.3
  L1 w0.15: v3(17.6,12.2) 17.6,12.322 17.8,12.522 U3.55
  L4 w0.15: v3(17.6,12.2) 17.6,11.2 17.425,11.025 17.425,5.563 17.713,5.275 20.375,5.275 20.596,5.496 20.596,6.361 U2.2
QSPI_SD2: U2.3 U3.54 | length 7.8
  L1 w0.15: v3(17.95,10.5) 17.95,11.565 18.2,11.815 U3.54
  L4 w0.15: v3(17.95,10.5) 17.95,8.65 19.311,7.289 19.311,6.561 19.365,6.507 19.311,6.454 U2.3
QSPI_SD3: U2.7 U3.51 | length 3.9
  L1 w0.15: U3.51 19.4,13.1 19.646,12.854 19.654,12.854 19.685,12.823 19.694,12.823 19.971,12.546 20.497,12.546 20.9,12.143 v3(20.9,12.1)
  L4 w0.15: U2.7 20.637,13.598 20.637,12.485 20.9,12.222 v3(20.9,12.1)
QSPI_SS: R6.2 U2.1 U3.56 | length 26.2
  L1 w0.15: R6.2 v1(14.5,5.4) ; v1(16.3,13.7) 16.422,13.7 16.672,13.45 U3.56
  L4 w0.15: v1(14.5,5.4) 14.5,6.9 16.3,8.7 16.3,13.587 v1@16.3,13.629 ; v1(16.3,13.7) 16.8,13.2 16.8,5.4 17.202,4.998 21.598,4.998 21.905,5.305 U2.1
RUN: R10.1 S2.2 U3.26 | length 6.7
  L1 w0.15: U3.26 21.8,5.4 22.16,5.04 R10.1
  L1 w0.3: R10.1@22.805,5.04 22.805,3.995 23.8,3 S2.2
U\S\B\_\B\O\O\T\: R4.1 R6.1 S1.2 | length 5.5
  L1 w0.2: S1.2 10.4,3 11.25,3.85 R4.1 R6.1
USB_A_D_N: D5.3 J2.2 U1.4 | length 28
  L1 w0.2: U1.4 14.2,17.75 14.35,17.9 14.35,18.2
  L1 w0.3: 14.35,18.2 14.35,18.524 14.526,18.7 23.55,18.7 27.517,14.733 27.81,14.44 30.66,14.44 31.53,13.57 31.53,12.272 31.28,12.022 D5.3 31.28,10.948 31.581,10.647 32.553,10.647 33.45,9.75 34,9.75 34.525,9.225 J2.2@34.975,9.225
USB_A_D_P: D5.1 J2.3 U1.5 | length 28.6
  L1 w0.2: 13.65,18.15 13.65,17.95 13.8,17.8 U1.5
  L1 w0.3: 13.65,18.15 13.65,18.85 14,19.2 23.757,19.2 28.017,14.94 30.867,14.94 32.03,13.777 32.03,12.272 32.28,12.022 32.28,11.147 32.76,11.147 33.657,10.25 34,10.25 34.525,10.775 J2.3@34.975,10.775
USB_C_D_N: D4.3 J1.A7 U1.6 | length 14.7
  L1 w0.2: 12.5,16.75 12.75,16.75 12.95,16.55 U1.6
  L1 w0.3: J1.A7 3.825,10.125 4.2,10.5 D4.3@5.5,10.5 ; D4.3 5.5,11.342 5.75,11.592 5.75,12.062 7.188,13.5 8.2,13.5 11.25,16.55 11.9,16.55 12.1,16.75 12.5,16.75
USB_C_D_P: D4.1 J1.A6 U1.7 | length 15
  L1 w0.2: 12.5,15.9 12.75,15.9 13,16.15 U1.7
  L1 w0.3: J1.A6 2.45,9.625 4.033,9.625 4.408,10 6.232,10 6.5,10.268 ; D4.1 6.5,11.342 6.25,11.592 6.25,11.854 7.396,13 8.407,13 11.457,16.05 11.9,16.05 12.05,15.9 12.5,15.9
USB_D_N: R7.1 U1.2 | length 7.4
  L1 w0.2: U1.2 15.619,16.55 15.833,16.764 v1(15.936,16.764)
  L1 w0.3: v1@17.775,16.7 17.838,16.763 20.991,16.763 21.3,16.454 21.3,16.075 21,15.775 R7.1
  L4 w0.2: v1(15.936,16.764) 16,16.7 17.512,16.7 v1(17.556,16.657)
USB_D_P: R5.1 U1.1 | length 8.8
  L1 w0.2: U1.1 15.85,16.15
  L1 w0.3: 15.85,16.15 16.2,16.15 17.313,17.263 21.199,17.263 21.8,16.661 21.8,16.075 22.1,15.775 R5.1
XIN: C4.2 U3.20 Y1.1 | length 5.6
  L1 w0.15: C4.2 Y1.1 17.54,5.24 17.9,5.6 19.1,5.6 19.4,5.9 U3.20
XOUT: R13.2 U3.21 | length 2.6
  L1 w0.15: U3.21 19.8,5.8 20.04,5.56 20.7,5.56 21.085,5.175 21.11,5.175 21.31,4.975 R13.2
pads on no net: D4.2 D4.5 D5.2 D5.5 J1.A2 J1.A3 J1.A8 J1.A10 J1.A11 J1.B2 J1.B3 J1.B5 J1.B6 J1.B7 J1.B8 J1.B10 J1.B11 J2. U3.2 U3.3 U3.4 U3.5 U3.6 U3.7 U3.8 U3.9 U3.11 U3.12 U3.13 U3.15 U3.16 U3.17 U3.18 U3.24 U3.25 U3.27 U3.28 U3.30 U3.31 U3.32 U3.34 U3.35 U3.36 U3.38 U3.39 U3.40 U3.41 U4.4

## Polygon pours and split planes (outlines as drawn)
+5V_VBUS on L3 (PWR) "+5V_VBUS_L03_P006" (solid, pour order 6): 0.5,19.5 39.5,19.5 39.5,0.5 0.5,0.5
+3V3_REG on L3 (PWR) "+3V3_REG_L03_P005" (solid, pour order 5): 30.2,10.85 29.65,10.3 28.366,10.3 26.835,8.769 26.835,5.885 24.95,4 9.75,4 8.5,5.25 8.5,5.6 9.15,6.25 11.25,6.25 13.75,8.75 13.75,11.5 14.75,12.5 16.2,12.5 18,14.3 18,16.05 20.05,18.1 24.234,18.1 26.642,15.692 28.667,13.667 30.2,12.134
GND on L2 (GND) "GND_L02_P000" (solid, pour order 0): 0.5,19.6 39.5,19.6 39.5,0.5 0.5,0.5

## Silkscreen, mask and mechanical layers (free items; w line width, h text height)
Top Overlay:
  lines w0.254: 5.7,0.7 5.7,5.3 ; 35.8,19.4 39.1,19.4
  text "INJ/UPL" at 31.254,17.654 h1.2
  text "RST" at 31.854,0.754 h1.52
  text "USBB" at 7.7,0.5 h1.2 r90